# Altium PCB Daughter_PCB.PcbDoc
Units mil, origin at the board's own origin, x right, y up, seen from the top; angles counter-clockwise.
Board outline 1289.97 x 1509.97 mil, 2 copper layers (Top Layer, Bottom Layer); 31 components, 20 nets, 129 pads, 0 vias.
Unrouted connection lines stored in the file: 61.
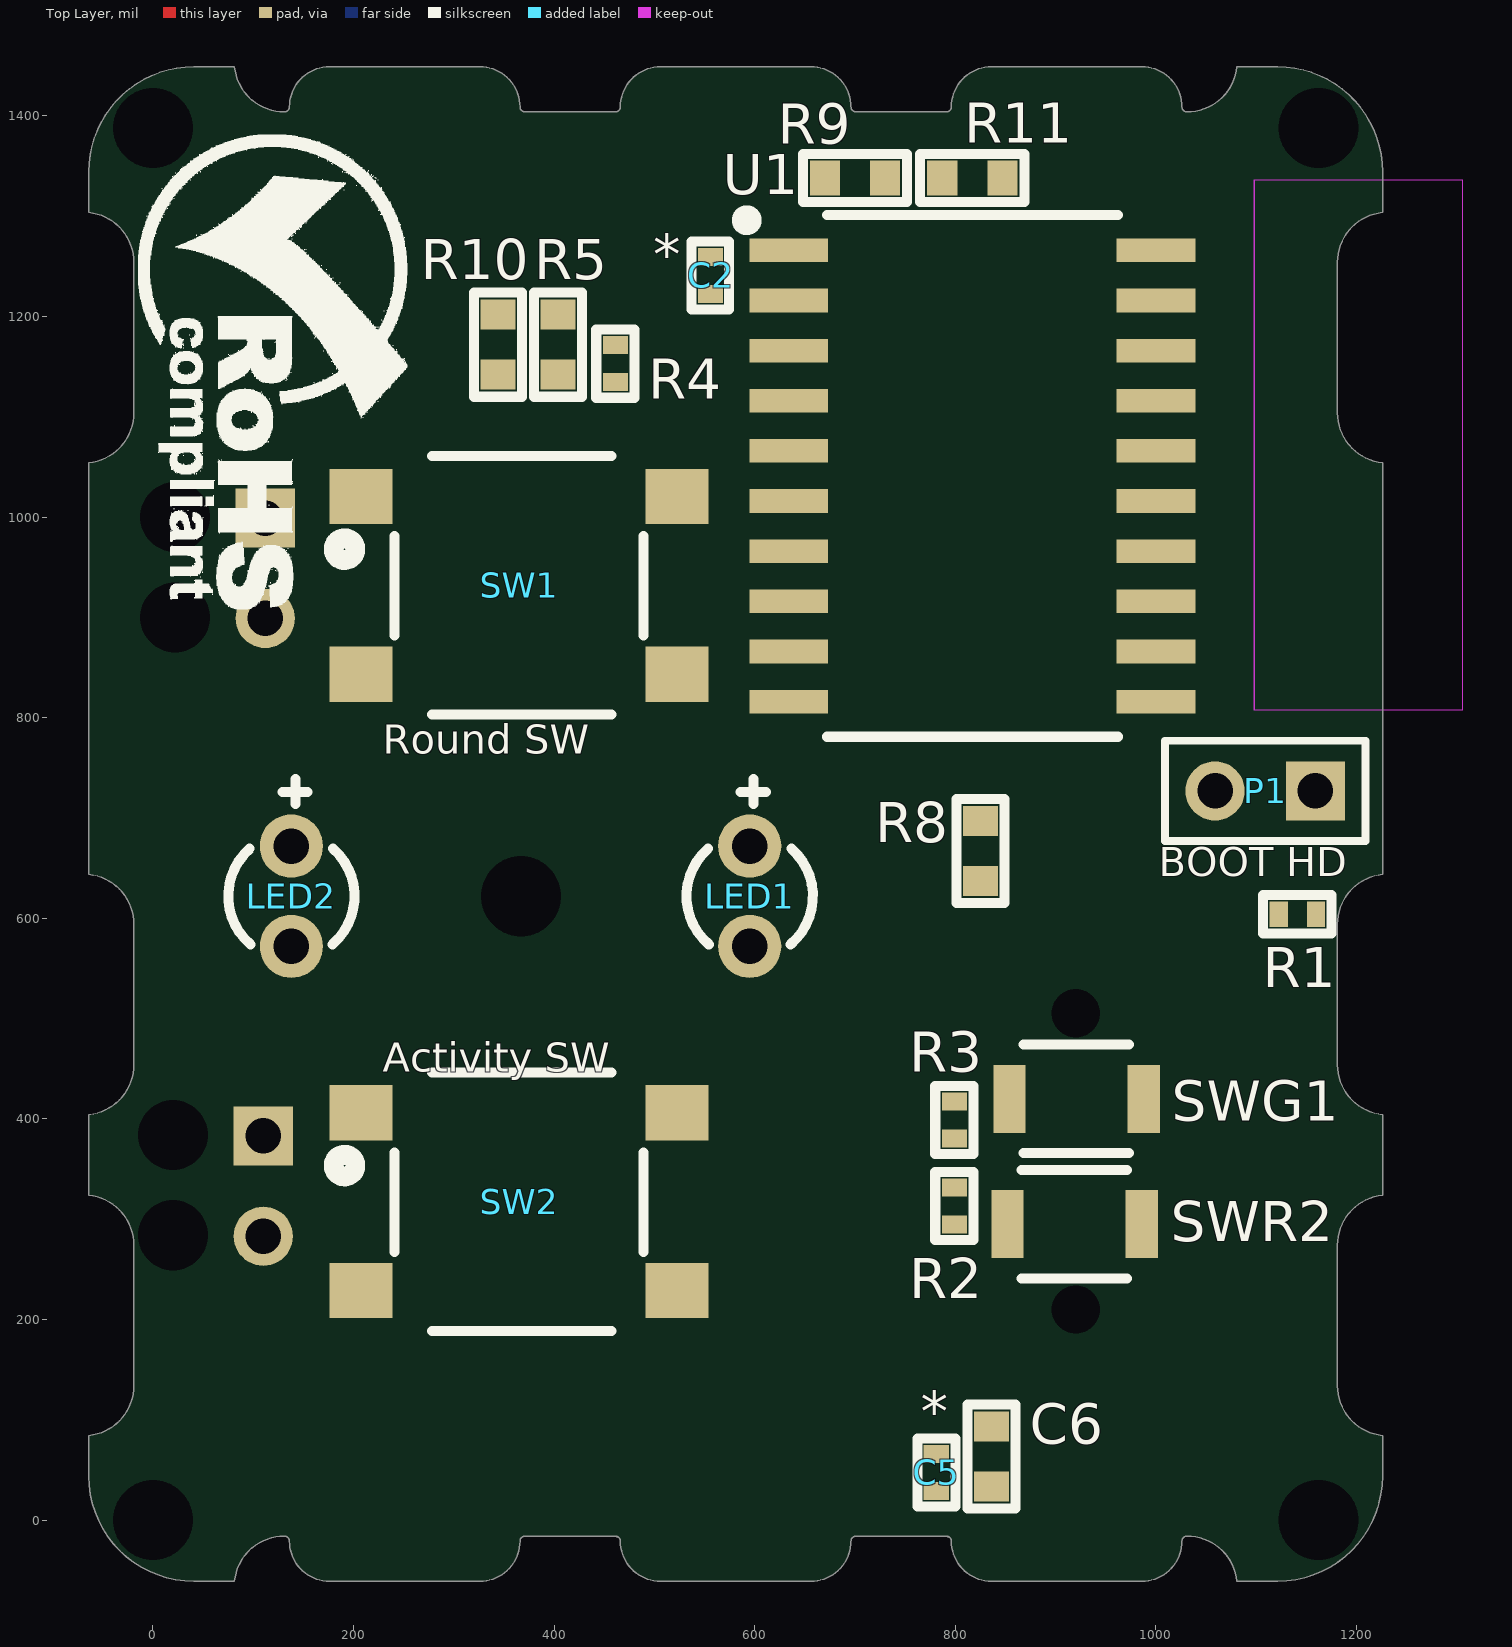
[diagram p0: Top Layer view]
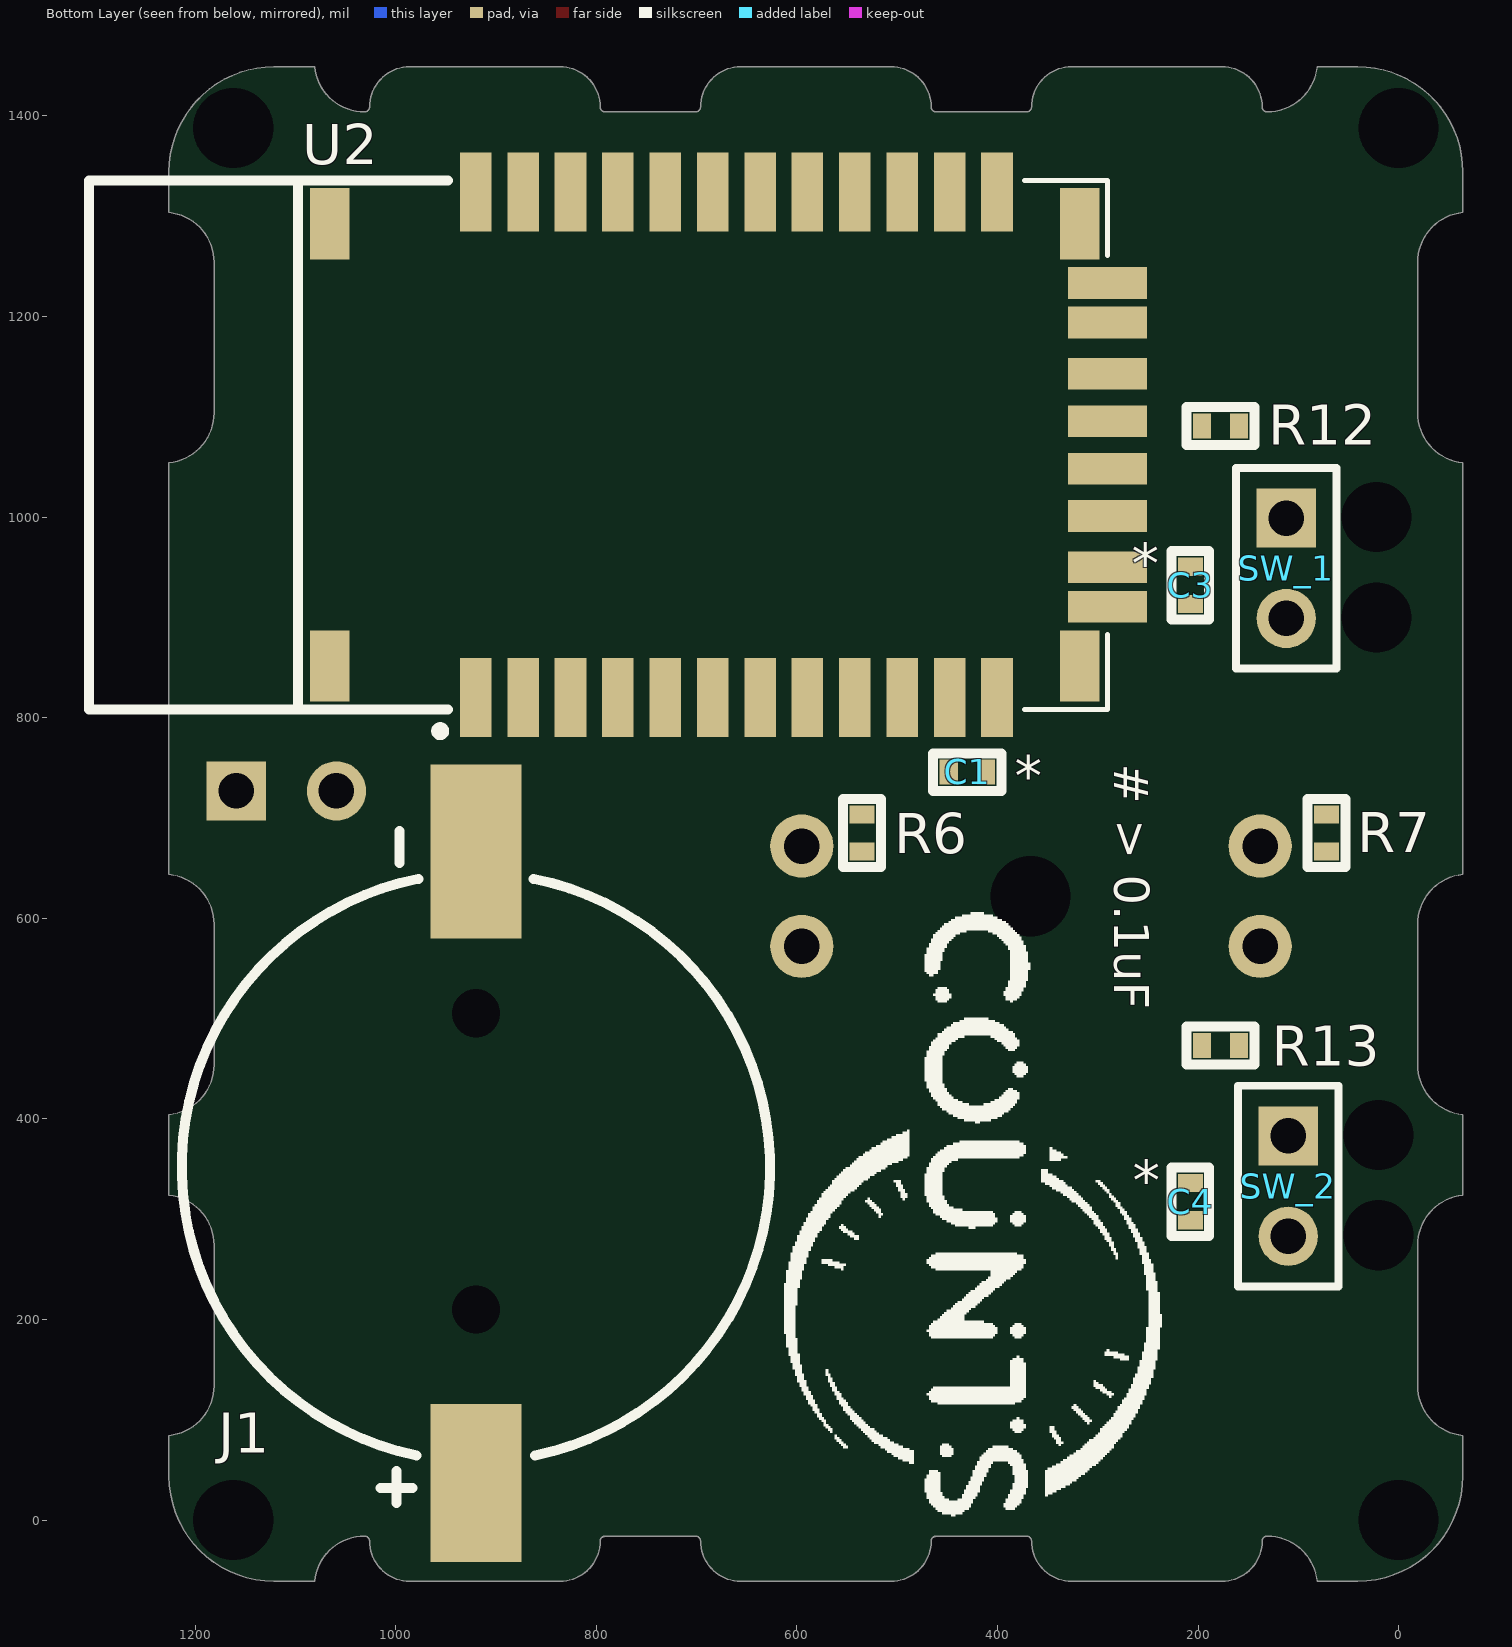
[diagram p1: Bottom Layer view, seen from below]

## Layer stack, top to bottom
Top Solder: solder mask 0.4, Solder Resist, Dk 3.5
Top Layer: signal copper 1.4
Dielectric 1: dielectric 12.6, FR-4, Dk 4.8
Bottom Layer: signal copper 1.4
Bottom Solder: solder mask 0.4, Solder Resist, Dk 3.5

## Board outline
-63.99,43.69 cw(c40.72,43.72) -63.99,43.72 -63.99,84.24 ccw(c-69,134) -18.98,134 -18.98,274 cw(c-24,274) -18.98,273.91 -18.98,274 ccw(c-69,274) -63.98,323.76 -63.98,404.24 ccw(c-69,454) -18.98,454 -18.98,594 cw(c-24,594) -18.98,593.91 -18.98,594 ccw(c-69,594) -63.98,643.76 -63.98,729 ccw(c-69,729) -63.98,729.07 -63.98,1054.24 ccw(c-69,1104) -18.98,1104 -18.98,1254 ccw(c-69,1254) -63.98,1303.76 -63.98,1344.28 cw(c40.72,1344.28) 40.72,1448.99 ccw(c40.72,1454) 40.83,1448.99 81.24,1448.99 ccw(c131,1454) 131,1403.99 ccw(c131,1409) 136.02,1409 cw(c176,1409) 176,1448.99 326,1448.99 cw(c326,1409) 365.99,1409 ccw(c371,1409) 371,1403.99 461,1403.99 ccw(c461,1409) 464.55,1405.46 ccw(c461,1409) 466.02,1409 cw(c506,1409) 506,1448.99 656,1448.99 cw(c656,1409) 695.99,1409 ccw(c701,1409) 701,1403.99 791,1403.99 ccw(c791,1409) 794.55,1405.46 ccw(c791,1409) 796.02,1409 cw(c836,1409) 836,1448.99 986,1448.99 cw(c986,1409) 1025.99,1409 ccw(c1031,1409) 1031,1403.99 ccw(c1031,1454) 1080.76,1448.99 1121.28,1448.99 cw(c1121.28,1454) 1121.17,1448.99 1121.28,1448.99 cw(c1121.28,1344.28) 1225.99,1344.28 1225.99,1303.76 ccw(c1231,1254) 1180.99,1254 1180.99,1104 ccw(c1231,1104) 1225.99,1054.24 1225.99,729 ccw(c1231,729) 1225.99,729 cw(c1231,729) 1225.99,729.07 1225.99,729 1225.99,643.76 ccw(c1231,594) 1180.98,594 ccw(c1186,594) 1180.99,593.91 1180.99,454 ccw(c1231,454) 1225.99,404.24 1225.99,323.76 ccw(c1231,274) 1180.99,274 ccw(c1186,274) 1180.99,273.91 1180.99,134 cw(c1186,134) 1180.99,134.08 1180.99,134 ccw(c1231,134) 1225.99,84.24 1225.99,43.72 cw(c1121.28,43.72) 1225.99,43.69 cw(c1231,43.72) 1225.99,43.75 1225.99,43.69 cw(c1121.28,43.72) 1121.28,-60.99 ccw(c1121.28,-66) 1121.17,-60.99 1080.76,-60.99 ccw(c1031,-66) 1031,-15.99 ccw(c1031,-21) 1025.99,-21 cw(c986,-21) 986,-60.99 836,-60.99 cw(c836,-21) 796.02,-21 ccw(c791,-21) 794.55,-17.46 ccw(c791,-21) 791,-15.99 cw(c791,-21) 794.55,-17.46 791,-15.99 701,-15.99 ccw(c701,-21) 695.99,-21 cw(c656,-21) 656,-60.99 506,-60.99 cw(c506,-21) 466.02,-21 ccw(c461,-21) 464.55,-17.46 ccw(c461,-21) 461,-15.99 cw(c461,-21) 464.55,-17.46 461,-15.99 371,-15.99 ccw(c371,-21) 365.99,-21 cw(c326,-21) 326,-60.99 176,-60.99 cw(c176,-21) 136.02,-21 ccw(c131,-21) 131,-15.99 ccw(c131,-66) 81.24,-60.99 40.72,-60.99 cw(c40.72,43.72)

## Design rules (kind name [scope] priority, off if disabled: settings)
Clearance [All] p1: gap=7 ignorepadtopadclearanceinfootprint=FALSE
HoleSize [All] p1: absolutevalues=TRUE maxlimit=1000 minlimit=1 maxpercent=80.000 minpercent=20.000
HoleToHoleClearance [All] p1: gap=1 allowstackedmicrovias=TRUE
MinimumSolderMaskSliver [All] p1: minsoldermaskwidth=0
PolygonConnect [All] p1: connectstyle=Relief reliefconductorwidth=10 reliefentries=4 polygonreliefangle="90 Angle" airgapwidth=10
RoutingVias [All] p1: holewidth=28 width=50 viastyle="Through Hole" minholewidth=28 minwidth=50 maxholewidth=28 maxwidth=50
SilkToSilkClearance [All] p1: silktosilkclearance=0
SilkToSolderMaskClearance [IsPad] p1: minsilkscreentomaskgap=0 clearancetoexposedcopper=TRUE
SolderMaskExpansion [All] p1: expansion=4
Width [All] p1: maxlimit=50 minlimit=10 preferedwidth=12 minimp=50.000000 maximp=50.000000 favimp=50.000000
25 further rules are at their usual default settings.

## Classes and differential pairs
component class U_Power_Section: C5 C6 J1
component class U_Peripheral_Section: C2 R2 R3 R4 R5 R8 R9 R10 R11 SWG1 SWR2 U2
component class U_Controller_Section: C1 C3 C4 LED1 LED2 P1 R1 R6 R7 R12 R13 SW1 SW2 SW_1 SW_2 U1

## Components (designator, comment, footprint, x,y, rotation, side; value= is the part's Value field where it differs from the comment)
C1 "0.1uF" Cap0402 430,746 r180 bottom
C2 "0.1uF" Cap0402 556,1241 r270 top
C3 "0.1uF" Cap0402 207.52,932 r270 bottom
C4 "0.1uF" Cap0402 207.52,317.41 r270 bottom
C5 "0.1uF" Cap0402 781,47.5 r90 top
C6 "1uF" Cap0603 836.01,63.3 r90 top
J1 "CR1220-2" CR1220-2 920,351.73 r90 bottom locked value=Cuctom
LED1 "LTL-10223W" LTL-10223W 595,622 r90 top
LED2 "LTL-4231N" LTL-4231N 138,622 r90 top
P1 "61300211121" HDR1X2 1159,727 r180 top
R1 "4.7K" Res0402 1141,604 r180 top
R2 "10K" Res0402 799,313 r90 top
R3 "10K" Res0402 799,399 r270 top
R4 "10K" Res0402 461,1153 r270 top
R5 "100K" Res0603 404,1172 r90 top
R6 "470R" Res0402 535,685 r90 bottom
R7 "470R" Res0402 72,685 r90 bottom
R8 "100K" Res0603 825,667 r270 top
R9 "100K" Res0603 700,1338 r180 top
R10 "100K" Res0603 344,1172 r90 top
R11 "100K" Res0603 817,1338 r0 top
R12 "10K" Res0402 177.5,1091 r180 bottom
R13 "10K" Res0402 177.5,473 r180 bottom
SW1 "B3FS-1012P" B3FS-1012P 365,932 r180 top
SW2 "B3FS-1012P" B3FS-1012P 365,317.42 r180 top
SW_1 "61300211121" HDR1X2 112,999 r270 bottom
SW_2 "61300211121" HDR1X2 110,383 r270 bottom
SWG1 "B3U-1000P" B3U-1000P 921,420 r0 top
SWR2 "B3U-1000P" B3U-1000P 919,295 r0 top
U1 "ATTINY1616-SFR" ATTINY1616-SFR 817,1041 r0 top locked
U2 "RN42-I/RM" RN42-I/RM 678,1072 r90 bottom locked

## Footprints (in the part's own frame and the unit in brackets; to place one, negate y for a bottom-side part, rotate by r counter-clockwise, add the part's x,y. Pads: shape width x height; smd on the part's side, far side on the other; paste and mask are expansions set on the pad)
ATTINY1616-SFR [mm]
  rect 2x0.6 smd: 1(-4.65,5.715) 2(-4.65,4.445) 3(-4.65,3.175) 4(-4.65,1.905) 5(-4.65,0.635) 6(-4.65,-0.635) 7(-4.65,-1.905) 8(-4.65,-3.175) 9(-4.65,-4.445) 10(-4.65,-5.715) 11(4.65,-5.715) 12(4.65,-4.445) 13(4.65,-3.175) 14(4.65,-1.905) 15(4.65,-0.635) 16(4.65,0.635) 17(4.65,1.905) 18(4.65,3.175) 19(4.65,4.445) 20(4.65,5.715)
  silkscreen extent -5.84,-6.6 3.68,6.6, body extent -5.32,-6.5 5.32,6.5, height 2.64
B3FS-1012P [mm]
  rect 1.6x1.4 smd: 1(4,-2.25) 2(-4,-2.25) 3(4,2.25) 4(-4,2.25)
  silkscreen extent -3.15,-3.28 4.69,3.28, body extent -4,-3.15 4,3.15, height 3.1
B3U-1000P [mm] "SWITCH TACTILE SPST-NO 0.05A 12V"
  rect 0.82x1.72 smd: 1(-1.7,0) 2(1.7,0)
  silkscreen extent -1.35,-1.37 1.32,1.37, body extent -2,-1.26 2,1.24, height 1.6
Cap0402 [mil]
  rect 18x25 smd: 1(-18.5,0) 2(18.5,0)
  silkscreen extent -34,-19 34,19, body extent -20,-10 20,10, height 19
Cap0603 [mil]
  rect 30x35 smd: 1(30,0) 2(-30,0)
  silkscreen extent -52,-24 52,24, body extent -31,-16 32,16, height 34
CR1220-2 [mm]
  rect 4x2.3 smd: 1(-8,0)
  rect 4.4x2.3 smd: 2(8,0)
  round 0 hole 1.22: MH1(-3.6,0) MH2(3.9,0)
  silkscreen extent -8.5,-7.45 8.52,7.45, body extent -9.8,-7.45 9.9,7.45, height 4
HDR1X2 [mm] "CONN HEADER VERT 2POS 2.54MM"
  rect 1.5x1.5 hole 0.9: 1(0,0)
  round 1.5 hole 0.9: 2(2.54,0)
  silkscreen extent -1.27,-1.27 3.81,1.27, body extent -1.27,-1.27 3.81,1.27, height 8.44
LTL-4231N [mm]
  round 1.6 hole 0.9: 1(-1.27,0) 2(1.27,0)
  silkscreen extent -1.22,-1.6 2.97,1.6, body extent -1.5,-2 2,2, height 6.25
LTL-10223W [mm]
  round 1.6 hole 0.9: 1(-1.27,0) 2(1.27,0)
  silkscreen extent -1.22,-1.6 2.97,1.6, body extent -1.5,-2 2,2, height 6.25
Res0402 [mil]
  rect 18x25 smd: 1(-18.5,0) 2(18.5,0)
  silkscreen extent -34,-19 34,19, body extent -23,-11 23,11, height 16
Res0603 [mil]
  rect 30x35 smd: 1(30,0) 2(-30,0)
  silkscreen extent -52,-24 52,24, body extent -31,-17 31,17, height 18
RN42-I/RM [mm]
  rect 2x0.8 smd: 1(-6.4,6.15) 2(-6.4,4.95) 3(-6.4,3.75) 4(-6.4,2.55) 5(-6.4,1.35) 6(-6.4,0.15) 7(-6.4,-1.05) 8(-6.4,-2.25) 9(-6.4,-3.45) 10(-6.4,-4.65) 11(-6.4,-5.85) 12(-6.4,-7.05) 13(6.4,-7.05) 14(6.4,-5.85) 15(6.4,-4.65) 16(6.4,-3.45) 17(6.4,-2.25) 18(6.4,-1.05) 19(6.4,0.15) 20(6.4,1.35) 21(6.4,2.55) 22(6.4,3.75) 23(6.4,4.95) 24(6.4,6.15)
  rect 0.8x2 smd: 28(3.1,-9.85) 29(-3.1,-9.85) 30(4.1,-9.85) 31(1.8,-9.85) 32(0.6,-9.85) 33(-0.6,-9.85) 34(-1.8,-9.85) 35(-4.1,-9.85)
  rect 1.8x1 smd: S1(-5.6,-9.15) S2(5.6,-9.15) S3(5.6,9.85) S4(-5.6,9.85)
  Keep-Out Layer region: 6.7,10.657 -6.704,10.657 -6.704,15.95 6.7,15.95
  Keep-Out Layer region: 6.7,10.667 -6.71,10.667 -6.71,15.95 6.7,15.95
  silkscreen extent -7.35,-9.85 6.7,15.95, body extent -6.7,-9.85 6.7,15.95, height 2.4

## Part data
C1 C2 C3 C4 C5: library part CC0402KRX7R7BB104, "CAP CER 0.1UF 16V X7R 0402", Capacitance=100nF, Case/Package=0402, Case Code (Metric)=1005, Dielectric=X7R, Manufacturer=Yageo, Max Operating Temperature=125°C, Min Operating Temperature=-55°C, Package Quantity=1, Supplier Part Number 1=311-1338-1-ND, Tolerance=10%, Voltage=16V, Case Code (Imperial)=0402, ComponentLink1Description=http://www.yageo.com/documents/recent/UPY-GPHC_X7R_6.3V-to-50V_8.pdf?src-supplier=Avnet+Europe, ComponentLink1URL=http://www.yageo.com/documents/recent/UPY-GPHC_X7R_6.3V-to-50V_8.pdf?src-supplier=Avnet+Europe, ComponentLink2Description=http://www.yageo.com/documents/recent/UPY-GPHC_X7R_6.3V-to-50V_18.pdf?src-supplier=Digi-Key, ComponentLink2URL=http://www.yageo.com/documents/recent/UPY-GPHC_X7R_6.3V-to-50V_18.pdf?src-supplier=Digi-Key, ComponentLink3Description=http://www.yageo.com/documents/recent/UPY-GPHC_X7R_6.3V-to-50V_8.pdf?src-supplier=Avnet, ComponentLink3URL=http://www.yageo.com/documents/recent/UPY-GPHC_X7R_6.3V-to-50V_8.pdf?src-supplier=Avnet, ComponentLink4Description=http://www.yageo.com/documents/recent/UPY-GPHC_X7R_6.3V-to-50V_18.pdf?src-supplier=Mouser, ComponentLink4URL=http://www.yageo.com/documents/recent/UPY-GPHC_X7R_6.3V-to-50V_18.pdf?src-supplier=Mouser, ComponentLink5Description=http://www.farnell.com/datasheets/2167236.pdf?src-supplier=Element14, ComponentLink5URL=http://www.farnell.com/datasheets/2167236.pdf?src-supplier=Element14, ComponentLink6Description=http://www.farnell.com/datasheets/1489800.pdf?src-supplier=Element14, ComponentLink6URL=http://www.farnell.com/datasheets/1489800.pdf?src-supplier=Element14, Composition=Ceramic, Depth=0.5mm, Halogen Free="Halogen Free", Height=0.5mm, Lead Free="Lead Free", Length=1mm, Manufacturer Part Number=CC0402KRX7R7BB104, Mount="Surface Mount", Number of Pins=2, Packaging="Tape and Reel", Pricing 1="1=0.1, 10=0.034, 100=0.015, 500=0.0107, 1000=0.00841, 2500=0.00764, 5000=0.00703 (USD)", Radiation Hardening=No, REACH SVHC="No SVHC", Stock 1=16982736, Supplier 1=Digi-Key, Termination=SMD/SMT, Thickness=0.022inch, Voltage Rating=16V, Voltage Rating (DC)=16V, Width=0.02inch
C6: library part UMK107AB7105KA-T, "CAP CER 1UF 50V X7R 0603", Case/Package=0603, Case Code (Metric)=1608, Dielectric=X7R, Manufacturer="Taiyo Yuden", Max Operating Temperature=125°C, Min Operating Temperature=-55°C, Package Quantity=1, Supplier Part Number 1=587-3247-1-ND, Tolerance=10%, Voltage Rating=50V, Capacitance=1uF, Case Code (Imperial)=0603, ComponentLink1Description=http://www.farnell.com/datasheets/2048165.pdf?src-supplier=Element14, ComponentLink1URL=http://www.farnell.com/datasheets/2048165.pdf?src-supplier=Element14, ComponentLink2Description=https://www.murata.com/~/media/webrenewal/support/library/catalog/products/capacitor/mlcc/c02e.ashx?la=en-us&src-supplier=Digi-Key, ComponentLink2URL=https://www.murata.com/~/media/webrenewal/support/library/catalog/products/capacitor/mlcc/c02e.ashx?la=en-us&src-supplier=Digi-Key, ComponentLink3Description=https://www.yuden.co.jp/productdata/catalog/mlcc_all_e.pdf?src-supplier=Digi-Key, ComponentLink3URL=https://www.yuden.co.jp/productdata/catalog/mlcc_all_e.pdf?src-supplier=Digi-Key, ComponentLink4Description=https://www.yuden.co.jp/productdata/catalog/mlcc_all_e.pdf?src-supplier=Onlinecomponents.com, ComponentLink4URL=https://www.yuden.co.jp/productdata/catalog/mlcc_all_e.pdf?src-supplier=Onlinecomponents.com, Depth=0.8mm, Halogen Free="Halogen Free", Height=0.8mm, Length=1.6mm, Manufacturer Part Number=UMK107AB7105KA-T, Mount="Surface Mount", Packaging="Tape and Reel", Pricing 1="1=0.28, 10=0.19, 100=0.1079, 500=0.0762, 1000=0.0667 (USD)", Radiation Hardening=No, Stock 1=453098, Supplier 1=Digi-Key, Termination=SMD/SMT, Thickness=0.037inch, Voltage Rating (DC)=50V, Width=0.031inch
J1: "SMD Battery Holders, Clips & Contacts RoHS", Manufacturer=Q&J, Package=Cuctom, Manufacturer Part No=CR1220-2
LED1: "LED RED DIFFUSED T/H", Case/Package=Radial, Color=Red, Forward Current=30mA, Forward Voltage=2V, Manufacturer="Vishay Lite-On", Max Operating Temperature=100°C, Max Power Dissipation=100mW, Min Operating Temperature=-55°C, Package Quantity=1000, Reverse Voltage=5V, Supplier Part Number 1=160-1087-ND, Test Current=10mA, ComponentLink1Description=http://www.mouser.com/ds/2/239/_100_10223W-53344.pdf?src-supplier=Mouser, ComponentLink1URL=http://www.mouser.com/ds/2/239/_100_10223W-53344.pdf?src-supplier=Mouser, ComponentLink2Description=https://media.digikey.com/pdf/Data%20Sheets/Lite-On%20PDFs/LTL-10223W.pdf?src-supplier=Digi-Key, ComponentLink2URL=https://media.digikey.com/pdf/Data%20Sheets/Lite-On%20PDFs/LTL-10223W.pdf?src-supplier=Digi-Key, ComponentLink3Description=https://www.verical.com/server-webapp/html/getDatasheet?partID=141762&src-supplier=Verical, ComponentLink3URL=https://www.verical.com/server-webapp/html/getDatasheet?partID=141762&src-supplier=Verical, ComponentLink4Description=http://www1.futureelectronics.com/doc/LITE-ON/LTL-10223W.pdf?src-supplier=Future+Electronics, ComponentLink4URL=http://www1.futureelectronics.com/doc/LITE-ON/LTL-10223W.pdf?src-supplier=Future+Electronics, Depth=4.75mm, Diameter=4.75mm, Dominant Wavelength=623nm, Height=7.2mm, Illumination Color=Red, Lead Free="Lead Free", Length=4.75mm, Lens Color=Red, Lens Style=Dome,Diffused,Colored,Circular,Tinted, Lens Transparency=Diffused, Luminous Intensity=60mcd, Manufacturer Part Number=LTL-10223W, Mount="Through Hole", Number of Elements=1, Number of LEDs=1, Number of Pins=2, Packaging=Bulk, Power Dissipation=100mW, Pricing 1="1=0.36, 10=0.262, 100=0.1242, 500=0.0828, 1000=0.06486, 2500=0.06348, 5000=0.0552, 10000=0.04968, 25000=0.04416 (USD)", Radiation Hardening=No, Stock 1=31450, Supplier 1=Digi-Key, Viewing Angle=60°, Wavelength=623nm, Width=4.75mm
LED2: "LED GREEN DIFFUSED T/H", Case/Package=T, Color=Green, Forward Current=30mA, Forward Voltage=2.1V, Manufacturer="Vishay Lite-On", Max Operating Temperature=100°C, Max Power Dissipation=100mW, Min Operating Temperature=-55°C, Package Quantity=1000, Power Dissipation=120mW, Reverse Voltage=5V, Supplier Part Number 1=160-1142-ND, Test Current=10mA, ComponentLink1Description=http://www1.futureelectronics.com/doc/LITE%20ON/LITE-ON%20LTL-4231N.pdf?src-supplier=Future+Electronics, ComponentLink1URL=http://www1.futureelectronics.com/doc/LITE%20ON/LITE-ON%20LTL-4231N.pdf?src-supplier=Future+Electronics, ComponentLink2Description=https://www.verical.com/server-webapp/html/getDatasheet?partID=115099&src-supplier=Verical, ComponentLink2URL=https://www.verical.com/server-webapp/html/getDatasheet?partID=115099&src-supplier=Verical, ComponentLink3Description=http://www.onlinecomponents.com/productFiles/mf-LI/791p_100_ltl-4231n.pdf?src-supplier=Onlinecomponents.com, ComponentLink3URL=http://www.onlinecomponents.com/productFiles/mf-LI/791p_100_ltl-4231n.pdf?src-supplier=Onlinecomponents.com, ComponentLink4Description=http://www.jameco.com/Jameco/Products/ProdDS/697637.pdf?src-supplier=Jameco, ComponentLink4URL=http://www.jameco.com/Jameco/Products/ProdDS/697637.pdf?src-supplier=Jameco, Depth=4.45mm, Diameter=3mm, Dominant Wavelength=569nm, Height=4.45mm, Illumination Color=Green, Lead Free="Lead Free", Length=4.45mm, Lens Style=Diffused,Tinted,Dome,Colored,Circular, Luminous Intensity=12.6mcd, Manufacturer Part Number=LTL-4231N, Mount="Through Hole", Number of Elements=1, Number of LEDs=1, Number of Pins=2, Packaging=Bulk, Pricing 1="1=0.36, 10=0.262, 100=0.1242, 500=0.0828, 1000=0.06486, 2500=0.06348, 5000=0.0552, 10000=0.04968, 25000=0.04416 (USD)", Radiation Hardening=No, Stock 1=21640, Supplier 1=Digi-Key, Viewing Angle=60°, Wavelength=572nm, Width=4.45mm
P1 SW_1 SW_2: library part "Header 1x2", "CONN HEADER VERT 2POS 2.54MM", Color=Black, Current Rating=3A, Manufacturer="Wurth Electronics", Max Operating Temperature=125°C, Min Operating Temperature=-40°C, Supplier Part Number 1=732-5315-ND, Voltage Rating=250V, ComponentLink1Description=http://www.mouser.com/ds/2/445/6130xx11121-538006.pdf?src-supplier=Mouser, ComponentLink1URL=http://www.mouser.com/ds/2/445/6130xx11121-538006.pdf?src-supplier=Mouser, Connector Type="Male Pin", Contact Gender=Male, Contact Material="Copper Alloy,Copper", Contact Mating Length=0.236inch, Contact Plating=Gold, Gender=Male, Housing Material=PBT, Lead Free="Lead Free", Manufacturer Part Number=61300211121, Mount="Through Hole", Number of Contacts=2, Number of Positions=2, Number of Rows=1, Packaging=Bulk, Pitch=0.1inch, Pricing 1="1=0.13, 10=0.106, 25=0.088, 50=0.074, 100=0.067, 1000=0.061 (USD)", REACH SVHC=Unknown, Stock 1=219205, Supplier 1=Digi-Key, Termination="Through Hole"
R1: library part CR0402JF0472G, "4.7K ±5% 1/16W ±200ppm/°C 0402 Chip Resistor - Surface Mount RoHS", Manufacturer="LIZ Elec", Package=0402, Manufacturer Part No=CR0402JF0472G
R2 R3 R4 R12 R13: library part RK73B1ETTP103J, "RES 10K OHM 5% 1/10W 0402", Case/Package=0402, Case Code (Metric)=1005, Manufacturer="KOA Speer", Max Operating Temperature=155°C, Min Operating Temperature=-55°C, Package Quantity=10000, Power Rating=63mW, Resistance=10kR, Supplier Part Number 1=2019-RK73B1ETTP103JCT-ND, Temperature Coefficient=200ppm/°C, Tolerance=5%, Voltage Rating=50V, Case Code (Imperial)=0402, ComponentLink1Description=https://www.verical.com/server-webapp/html/getDatasheet?partID=89073&src-supplier=Verical, ComponentLink1URL=https://www.verical.com/server-webapp/html/getDatasheet?partID=89073&src-supplier=Verical, Composition="Thick Film", Depth=0.5mm, Height=0.35mm, Lead Free="Lead Free", Length=1mm, Manufacturer Part Number=RK73B1ETTP103J, Military Standard=Not, Mount="Surface Mount", Packaging="Tape and Reel", Pricing 1="1=0.1, 10=0.016, 100=0.0065, 1000=0.00292, 2500=0.00253, 5000=0.00209 (USD)", Stock 1=2917894, Supplier 1=Digi-Key, Termination=SMD/SMT, Voltage Rating (DC)=50V, Width=0.5mm
R5 R8 R9 R10 R11: library part RT0603BRD07100KL, "RES SMD 100K OHM 0.1% 1/10W 0603", Case/Package=0603, Case Code (Metric)=1608, Manufacturer=Yageo, Max Operating Temperature=125°C, Max Power Dissipation=100mW, Min Operating Temperature=-55°C, Package Quantity=5000, Resistance=100kR, Supplier Part Number 1=YAG1235CT-ND, Temperature Coefficient=25ppm/°C, Tolerance=0.1%, Voltage Rating=75V, Case Code (Imperial)=0603, ComponentLink1Description=http://documents.rs-components.com/techlib://itc_doclist_GB.htm?stockno=6174810&src-supplier=RSComponents, ComponentLink1URL=http://documents.rs-components.com/techlib://itc_doclist_GB.htm?stockno=6174810&src-supplier=RSComponents, Composition="Thin Film", Depth=0.8mm, Features="Moisture Resistant", Height=0.022inch, Lead Free="Lead Free", Length=1.6mm, Manufacturer Part Number=RT0603BRD07100KL, Military Standard=Not, Mount="Surface Mount", Number of Terminations=2, Packaging="Tape and Reel", Power Rating=100mW, Pricing 1="1=0.39, 10=0.332, 100=0.1298, 1000=0.05435, 2500=0.04982 (USD)", Stock 1=53395, Supplier 1=Digi-Key, Termination=SMD/SMT, Voltage Rating (DC)=75V, Width=0.031inch, Working Voltage=75V
R6 R7: library part RTT02471JTH, "470 ±5% 1/16W ±100ppm/°C 0402 Chip Resistor - Surface Mount RoHS", Manufacturer=RALEC, Package=0402, Manufacturer Part No=RTT02471JTH
SW1 SW2: "SWITCH TACTILE SPST-NO 0.05A 24V", Case/Package=SMD/SMT, Contact Resistance=100mR, Current Rating=50mA, Manufacturer=Omron, Max Operating Temperature=70°C, Max Voltage Rating (DC)=24V, Min Operating Temperature=-20°C, Operating Force=1.47N, Package Quantity=1, Supplier Part Number 1=SW1237CT-ND, Actuator Length=1.7mm, Actuator Type=Standard, ComponentLink1Description=https://omronfs.omron.com/en_US/ecb/products/pdf/en-b3fs.pdf?src-supplier=Digi-Key, ComponentLink1URL=https://omronfs.omron.com/en_US/ecb/products/pdf/en-b3fs.pdf?src-supplier=Digi-Key, ComponentLink2Description=http://omronfs.omron.com/en_US/ecb/products/pdf/en-b3fs.pdf?src-supplier=Digi-Key, ComponentLink2URL=http://omronfs.omron.com/en_US/ecb/products/pdf/en-b3fs.pdf?src-supplier=Digi-Key, Contact Plating=Silver, Depth=8mm, Electrical Life=300000Cycles, Illumination Type=Non-Illuminated, Length=6.3mm, Manufacturer Part Number=B3FS-1012P, Max Current Rating=50mA, Mechanical Life=300000Cycles, Mount="Surface Mount", Orientation=Straight, Packaging="Tape and Reel", Pricing 1="1=0.59, 10=0.569, 25=0.548, 100=0.4741, 250=0.43192, 500=0.40034 (USD)", Radiation Hardening=No, Stock 1=177804, Supplier 1=Digi-Key, Switch Function=Off-Mom, Switch Travel=0.25mm, Termination="Gull Wing", Throw Configuration=SPST, Voltage Rating (DC)=24V, Weight=0.2g
SWG1 SWR2: "SWITCH TACTILE SPST-NO 0.05A 12V", Contact Current Rating=50mA, Contact Resistance=100mR, Insulation Resistance=100MR, Manufacturer=Omron, Max Operating Temperature=70°C, Max Voltage Rating (DC)=12V, Min Operating Temperature=-25°C, Operating Force=1.5N, Package Quantity=1, Ratings="Dust Proof,IP40", Supplier Part Number 1=SW1020DKR-ND, Actuator Length=0.4mm, Actuator Type=Standard, ComponentLink1Description=http://www.farnell.com/datasheets/60838.pdf?src-supplier=Farnell, ComponentLink1URL=http://www.farnell.com/datasheets/60838.pdf?src-supplier=Farnell, ComponentLink2Description=http://www.farnell.com/datasheets/60838.pdf?src-supplier=Element14, ComponentLink2URL=http://www.farnell.com/datasheets/60838.pdf?src-supplier=Element14, ComponentLink3Description=https://omronfs.omron.com/en_US/ecb/products/pdf/en-b3u.pdf?src-supplier=Digi-Key, ComponentLink3URL=https://omronfs.omron.com/en_US/ecb/products/pdf/en-b3u.pdf?src-supplier=Digi-Key, ComponentLink4Description=http://www.omron.com/ecb/products/pdf/en-b3u.pdf?src-supplier=Digi-Key, ComponentLink4URL=http://www.omron.com/ecb/products/pdf/en-b3u.pdf?src-supplier=Digi-Key, ComponentLink5Description=https://www.distrelec.biz/Web/Downloads/he/et/B3U_eng_datasheet.pdf?mime=application%2Fpdf&src-supplier=Distrelec, ComponentLink5URL=https://www.distrelec.biz/Web/Downloads/he/et/B3U_eng_datasheet.pdf?mime=application%2Fpdf&src-supplier=Distrelec, ComponentLink6Description=http://www.onlinecomponents.com/productFiles/mf-OM/en-b3u.pdf?src-supplier=Onlinecomponents.com, ComponentLink6URL=http://www.onlinecomponents.com/productFiles/mf-OM/en-b3u.pdf?src-supplier=Onlinecomponents.com, ComponentLink7Description=https://www.verical.com/server-webapp/html/getDatasheet?partID=552554&src-supplier=Verical, ComponentLink7URL=https://www.verical.com/server-webapp/html/getDatasheet?partID=552554&src-supplier=Verical, ComponentLink8Description=http://www.farnell.com/datasheets/1685550.pdf?src-supplier=Element14, ComponentLink8URL=http://www.farnell.com/datasheets/1685550.pdf?src-supplier=Element14, ComponentLink9Description=http://www.farnell.com/datasheets/2610940.pdf?src-supplier=Farnell, ComponentLink9URL=http://www.farnell.com/datasheets/2610940.pdf?src-supplier=Farnell, ComponentLink10Description=https://www.alliedelec.com/m/d/4c8a9ef82804fc3c241a13c1e298fd73.pdf?src-supplier=Allied+Electronics, ComponentLink10URL=https://www.alliedelec.com/m/d/4c8a9ef82804fc3c241a13c1e298fd73.pdf?src-supplier=Allied+Electronics, Contact Material=Silver, Current Rating=50mA, Depth=2.5mm, Electrical Life=200000Cycles, Height=1.2mm, Illumination Type=Non-Illuminated,Illuminated, Lead Free="Lead Free", Length=4mm, Manufacturer Part Number=B3U-1000P, Max Current Rating=50mA, Mechanical Life=200000Cycles, Mount="Surface Mount", Orientation=Straight, Packaging="Tape and Reel", Pricing 1="1=1, 10=0.961, 25=0.9064, 50=0.7976, 100=0.7251, 250=0.68888, 500=0.67074, 1000=0.52571 (USD)", REACH SVHC=Unknown, Stock 1=116454, Supplier 1=Digi-Key, Switch Function=Off-Mom, Switch Travel=0.15mm, Termination=SMD/SMT, Throw Configuration=SPST, Voltage Rating (DC)=12V, Weight=0.000776oz, Width=3mm
U1: "IC MCU 8BIT 16KB FLASH 20SOIC", Manufacturer=Microchip, Supplier Part Number 1=ATTINY1616-SFRCT-ND, ComponentLink1Description=https://4donline.ihs.com/images/VipMasterIC/IC/MCHP/MCHP-S-A0008147170/MCHP-S-A0008495385-1.pdf?src-supplier=Farnell, ComponentLink1URL=https://4donline.ihs.com/images/VipMasterIC/IC/MCHP/MCHP-S-A0008147170/MCHP-S-A0008495385-1.pdf?src-supplier=Farnell, Manufacturer Part Number=ATTINY1616-SFR, Pricing 1="1=0.92, 25=0.85, 100=0.77 (USD)", Stock 1=1061, Supplier 1=Digi-Key
U2: "RX TXRX MODULE BT TRC ANT SMD", Case/Package=SMD/SMT, Current - Receiving=25mA, Current - Transmitting=30mA, Frequency=2.4GHz, Manufacturer=Microchip, Max Operating Temperature=85°C, Max Supply Voltage=3.6V, Min Operating Temperature=-40°C, Min Supply Voltage=3V, Operating Supply Voltage=3.3V, Package Quantity=64, Supplier Part Number 1=740-1038-ND, ComponentLink1Description=http://www.microchip.com/mymicrochip/filehandler.aspx?ddocname=en572993&src-supplier=Digi-Key, ComponentLink1URL=http://www.microchip.com/mymicrochip/filehandler.aspx?ddocname=en572993&src-supplier=Digi-Key, ComponentLink2Description=http://ww1.microchip.com/downloads/en/DeviceDoc/rn-42-ds-v2.3r.pdf?src-supplier=Avnet, ComponentLink2URL=http://ww1.microchip.com/downloads/en/DeviceDoc/rn-42-ds-v2.3r.pdf?src-supplier=Avnet, ComponentLink3Description=http://ww1.microchip.com/downloads/en/DeviceDoc/rn-42-ds-v2.32r.pdf?src-supplier=Future+Electronics, ComponentLink3URL=http://ww1.microchip.com/downloads/en/DeviceDoc/rn-42-ds-v2.32r.pdf?src-supplier=Future+Electronics, ComponentLink4Description=http://ww1.microchip.com/downloads/en/DeviceDoc/rn-42-ds-v2.32r.pdf?src-supplier=Digi-Key, ComponentLink4URL=http://ww1.microchip.com/downloads/en/DeviceDoc/rn-42-ds-v2.32r.pdf?src-supplier=Digi-Key, ComponentLink5Description=http://uk.rs-online.com/webdocs/11a8/0900766b811a8f51.pdf?src-supplier=RSComponents, ComponentLink5URL=http://uk.rs-online.com/webdocs/11a8/0900766b811a8f51.pdf?src-supplier=RSComponents, ComponentLink6Description=http://www.farnell.com/datasheets/1728644.pdf?src-supplier=Element14, ComponentLink6URL=http://www.farnell.com/datasheets/1728644.pdf?src-supplier=Element14, Data Rate=3Mbps, Height=2mm, Interface=UART,SPI, Lead Free="Lead Free", Length=25.8mm, Manufacturer Part Number=RN42-I/RM, Mount="Surface Mount", Number of Pins=35, Packaging=Tray, Pricing 1="1=15.27, 25=13.85, 100=13.404 (USD)", Radiation Hardening=No, REACH SVHC="No SVHC", Sensitivity=-80dBm, Stock 1=3126, Supplier 1=Digi-Key, Width=13.4mm

## Free pads (board coordinates)
  round 0 hole 70 unplated: 3(20,284) 3(20,384) 3(22,900) 3(22,1000)
  oct 0x0 hole 80: MH(0,0) MH(0,1388) MH(1162,0) MH(1162,1388)
  oct 0x120 hole 80: MH(367,622)

## Nets (pads, with @x,y where several pads share a name; then routed paths per layer and width w, separated by ;. In a path a pad name is that pad's centre, name@x,y a point inside that pad or via, vN(x,y) a via of type N, cw(c..) or ccw(c..) an arc to the next point about the centre after c; other vN are vias at no path point)
AIO_1: R4.2 U2.35
COIN_VBAT: C1.1 C2.1 C5.2 C6.2 J1.1 R2.2 R3.2 R6.2 R7.2 R12.2 R13.2 U1.1 U2.11
GND: C1.2 C2.2 C3.2 C4.2 C5.1 C6.1 J1.2 P1.2 R4.1 R5.1 R8.1 R9.1 R10.1 R11.1 SW1.3 SW2.3 SW_1.2 SW_2.2 SWG1.2 SWR2.2 U1.20 U2.1 U2.12 U2.28 U2.29
GPIO2: R11.2 U2.19
GPIO4: R3.1 SWG1.1
GPIO5: R9.2 U2.21
GPIO6: R8.2 U2.3
GPIO9: R10.2 U2.32
GPIO10: R5.2 U2.33
LED1: LED1.1 U1.4
LED2: LED2.1 U1.3
NetLED1_2: LED1.2 R6.1
NetLED2_2: LED2.2 R7.1
NetP1_1: P1.1 R1.1
PA1_: C3.1 R12.1 SW1.1 SW_1.1 U1.17
PA2_: C4.1 R13.1 SW2.1 SW_2.1 U1.18
RESET_: R2.1 SWR2.1 U2.5
RXD: U1.9 U2.13
TXD: U1.8 U2.14
UPDI_: R1.2 U1.16
pads on no net: J1.MH1 J1.MH2 SW1.2 SW1.4 SW2.2 SW2.4 U1.2 U1.5 U1.6 U1.7 U1.10 U1.11 U1.12 U1.13 U1.14 U1.15 U1.19 U2.2 U2.4 U2.6 U2.7 U2.8 U2.9 U2.10 U2.15 U2.16 U2.17 U2.18 U2.20 U2.22 U2.23 U2.24 U2.30 U2.31 U2.34 U2.S1 U2.S2 U2.S3 U2.S4

## Silkscreen, mask and mechanical layers (free items; w line width, h text height)
Top Overlay:
  drawing of 3073 lines, arcs and shapes, not listed
  text "*" at 526,1242 h40
  text "Round SW" at 229,754 h50
  text "BOOT HD" at 1003,632 h50
  text "Activity SW" at 229,437 h50
  text "*" at 793,88.76 h40
Bottom Overlay:
  drawing of 27 lines, arcs and shapes, not listed
  text "*" at 238.5,934 h40
  text "# > 0.1uF" at 295,754 h60 r90
  text "*" at 355.5,722 h40
  text "*" at 237.5,319 h40
Mechanical 1:
  circle w10: c595,622 r139.21
  circle w10: c138,622 r139.21
  text "For LED Covering, don't mount any part near or inside the circle." at 1273,608 h40
Mechanical 2:
  lines w10: -69,1344.28 cw(c40.72,1344.28) 40.72,1454 86,1454 ccw(c131,1454) 131,1409 cw(c176,1409) 176,1454 326,1454 cw(c326,1409) 371,1409 461,1409 cw(c506,1409) 506,1454 656,1454 cw(c656,1409) 701,1409 791,1409 cw(c836,1409) 836,1454 986,1454 cw(c986,1409) 1031,1409 ccw(c1031,1454) 1076,1454 1121.28,1454 cw(c1121.28,1344.28) 1231,1344.28 ; -69,1351 -69,1299 cw(c-69,1254) -24,1254 -24,1104 cw(c-69,1104) -69,1059 -69,969 -69,729 -69,639 cw(c-69,594) -24,594 -24,454 cw(c-69,454) -69,409 -69,319 cw(c-69,274) -24,274 -24,134 cw(c-69,134) -69,89 -69,43.72 ; 1231,1349 1231,1299 ccw(c1231,1254) 1186,1254 1186,1104 ccw(c1231,1104) 1231,1059 1231,969 1231,729 1231,639 ccw(c1231,594) 1186,594 1186,454 ccw(c1231,454) 1231,409 1231,319 ccw(c1231,274) 1186,274 1186,134 ; -69,43.72 ccw(c-69,43.72) -69,43.72 ; -69,43.72 ccw(c40.72,43.72) 40.72,-66 86,-66 cw(c131,-66) 131,-21 ccw(c176,-21) 176,-66 326,-66 ccw(c326,-21) 371,-21 461,-21 ccw(c506,-21) 506,-66 656,-66 ccw(c656,-21) 701,-21 791,-21 ccw(c836,-21) 836,-66 986,-66 ccw(c986,-21) 1031,-21 cw(c1031,-66) 1076,-66 1121.28,-66 ccw(c1121.28,43.72) 1231,43.72 ; 1186,134 ccw(c1231,134) 1231,89 ; 1186,134 ccw(c1231,134) 1231,89 ; 1231,43.72 ccw(c1231,43.72) 1231,43.72 ; 1231,43.72 1231,89